# Altium PCB Industrial_IOT_Dev_Brd-v1.0.PcbDoc (part 3 of 8)
Units mil, origin at the board's own origin, x right, y up, seen from the top; angles counter-clockwise.
Board outline 6299.21 x 4724.41 mil, 4 copper layers (Top Layer, Layer 1, Layer 2, Bottom Layer), stack 62.047 mil thick; 376 components, 240 nets, 1129 pads, 635 vias.
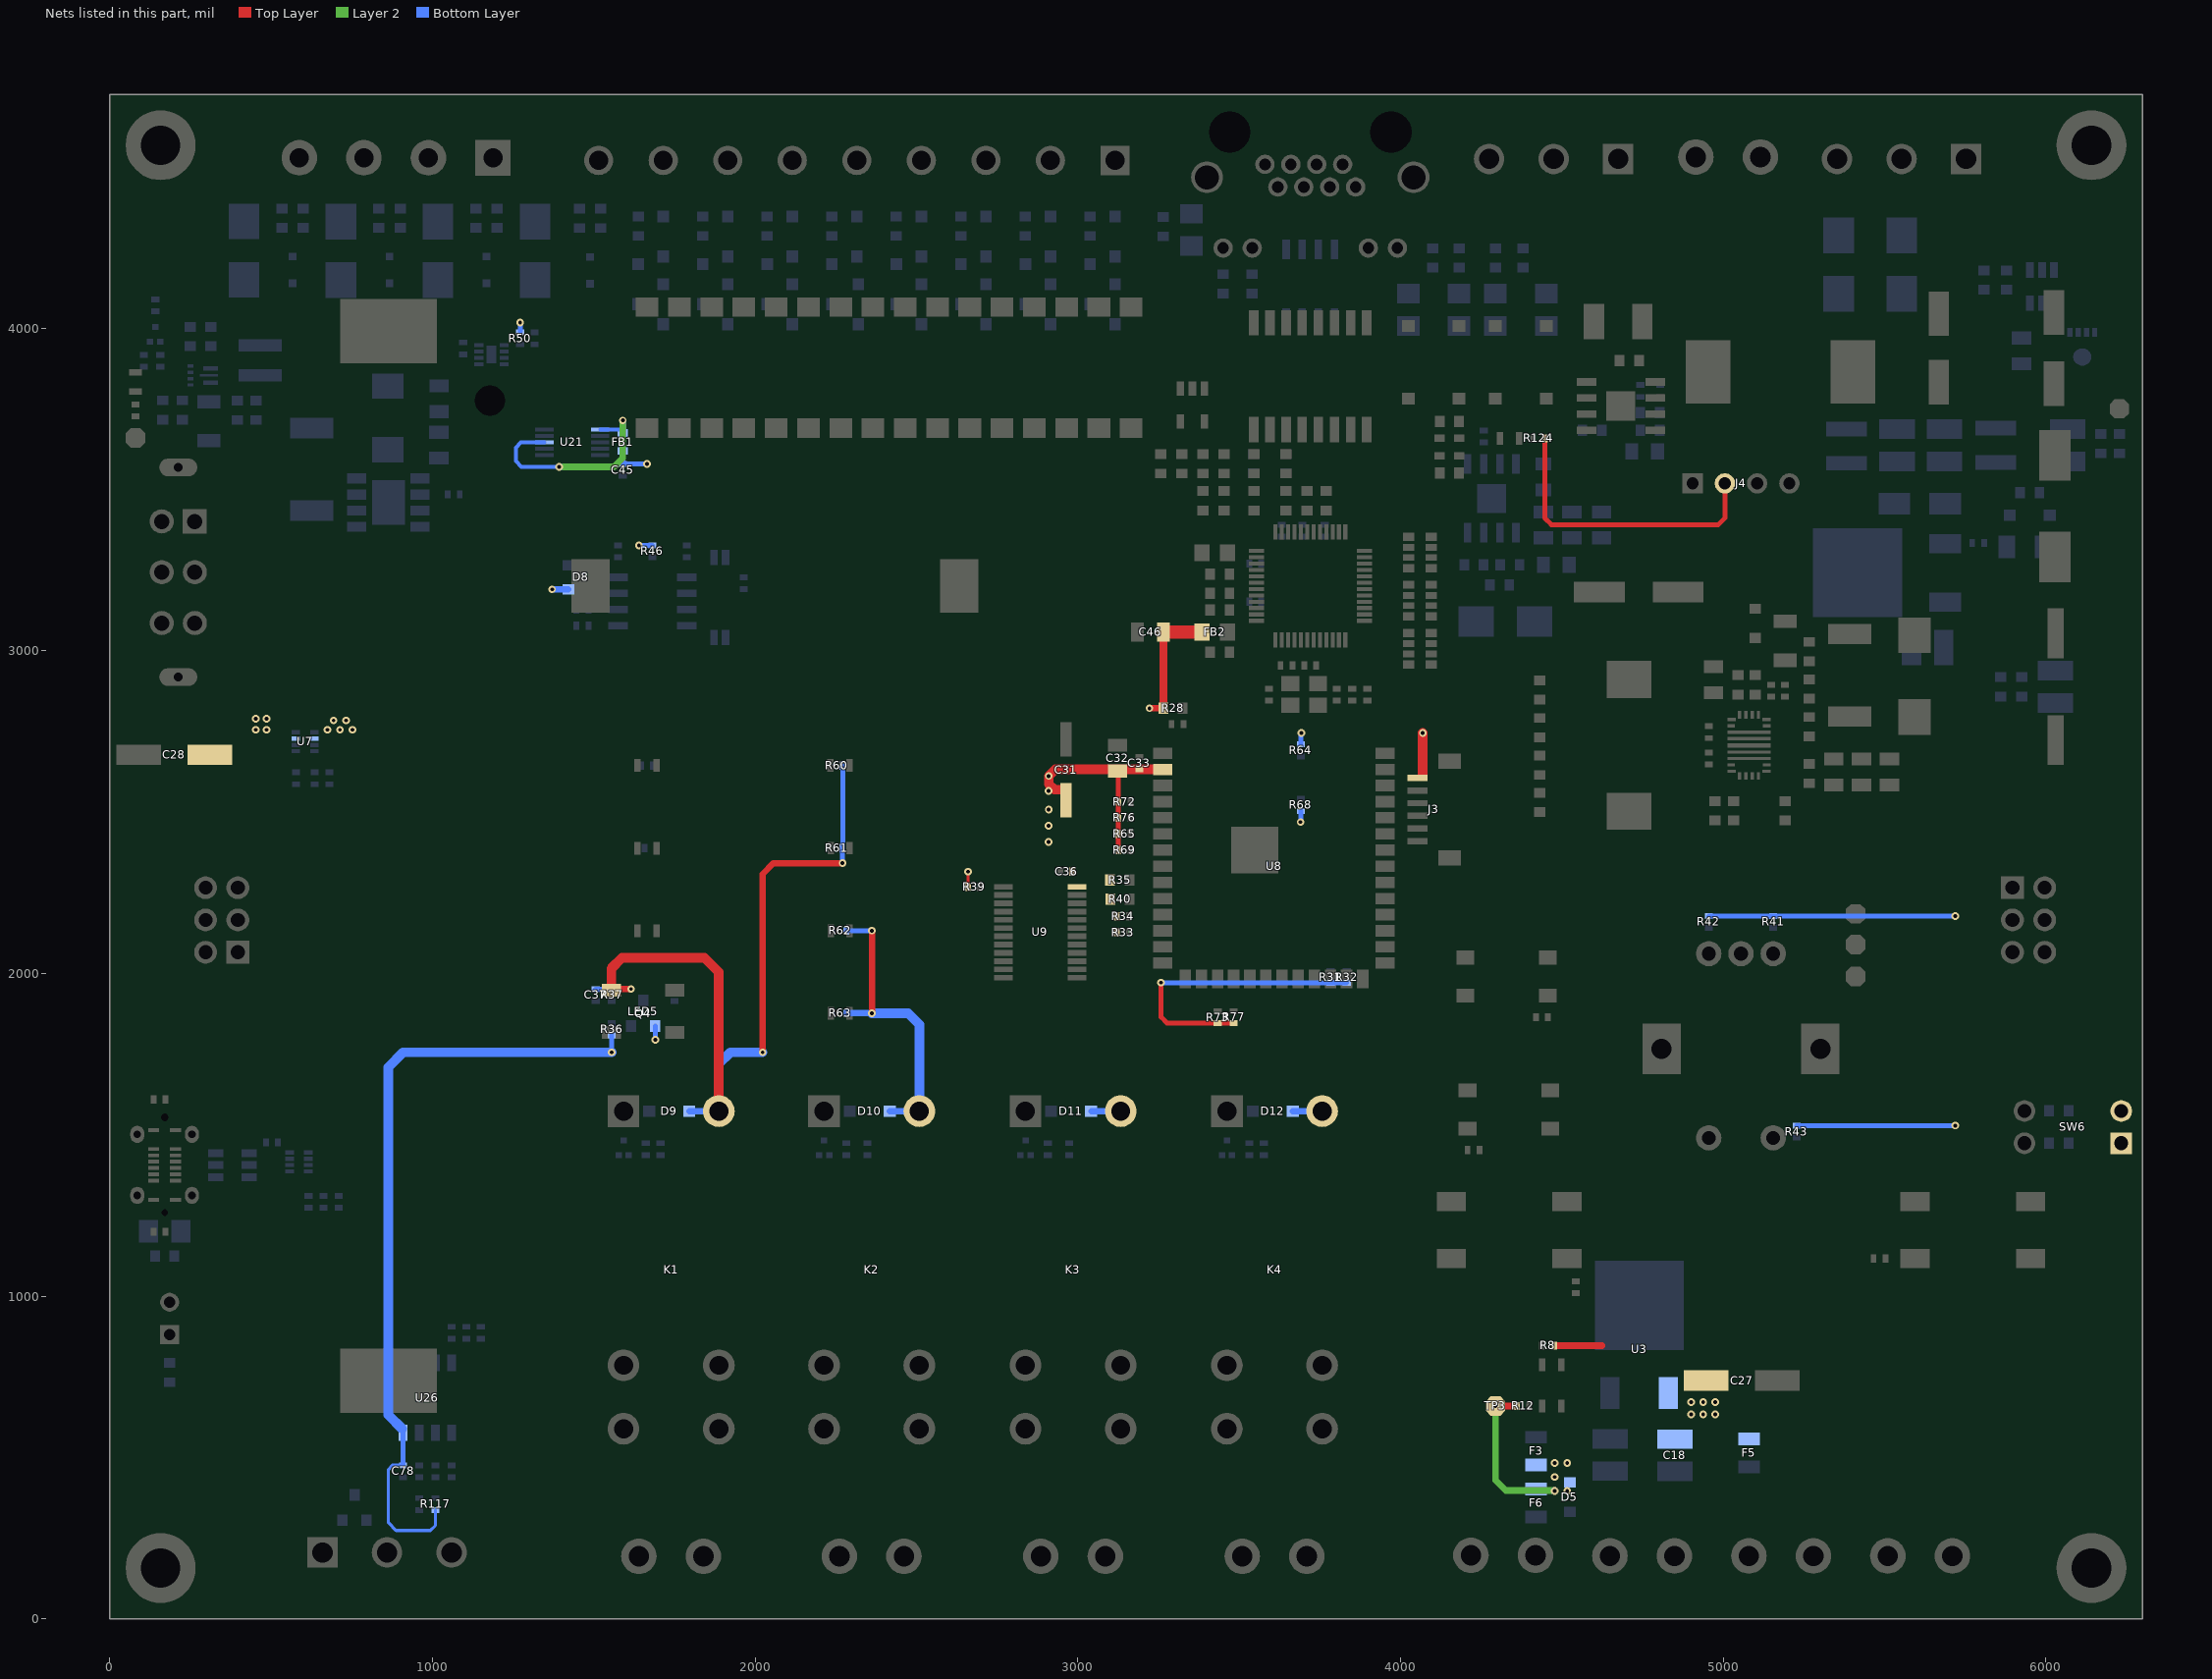
[diagram p4: the nets of this part, all layers, seen from the top]

## Part data (continued)
C80: library part CC0603KRX7R9BB103, "CAP CER 10000PF 50V X7R 0603", Case Code (Imperial)=0603, Case Code (Metric)=1608, Dielectric=X7R, Insulation Resistance=100GR, LCSC Part Number=C100042, Manufacturer=Yageo, Max Operating Temperature=125°C, Min Operating Temperature=-55°C, Package Quantity=1, Supplier Part Number 1=311-1085-6-ND, Tolerance=10%, Voltage=50V, Capacitance=10nF, Case/Package=0603, ComponentLink1Description=http://www.farnell.com/datasheets/1734573.pdf?src-supplier=Element14, ComponentLink1URL=http://www.farnell.com/datasheets/1734573.pdf?src-supplier=Element14, ComponentLink2Description=http://www.yageo.com/documents/recent/UPY-GPHC_X7R_6.3V-to-50V_18.pdf?src-supplier=Digi-Key, ComponentLink2URL=http://www.yageo.com/documents/recent/UPY-GPHC_X7R_6.3V-to-50V_18.pdf?src-supplier=Digi-Key, ComponentLink3Description=http://www.farnell.com/datasheets/2167236.pdf?src-supplier=Mouser, ComponentLink3URL=http://www.farnell.com/datasheets/2167236.pdf?src-supplier=Mouser, ComponentLink4Description=http://www.farnell.com/datasheets/70765.pdf?src-supplier=Element14, ComponentLink4URL=http://www.farnell.com/datasheets/70765.pdf?src-supplier=Element14, ComponentLink5Description=http://www.yageo.com/documents/recent/UPY-GPHC_X7R_6.3V-to-50V_8.pdf?src-supplier=Avnet+Europe, ComponentLink5URL=http://www.yageo.com/documents/recent/UPY-GPHC_X7R_6.3V-to-50V_8.pdf?src-supplier=Avnet+Europe, ComponentLink6Description=http://www.farnell.com/datasheets/1489800.pdf?src-supplier=Element14, ComponentLink6URL=http://www.farnell.com/datasheets/1489800.pdf?src-supplier=Element14, ComponentLink7Description=https://www.verical.com/server-webapp/html/getDatasheet?partID=403582&src-supplier=Verical, ComponentLink7URL=https://www.verical.com/server-webapp/html/getDatasheet?partID=403582&src-supplier=Verical, Composition=Ceramic, Depth=0.8mm, Halogen Free="Halogen Free", Height=0.8mm, Lead Free="Lead Free", Length=1.6mm, Manufacturer Part Number=CC0603KRX7R9BB103, Material=Ceramic, Mount="Surface Mount", Number of Pins=2, Packaging="Tape and Reel", Pricing 1="1=0.1, 10=0.038, 100=0.0171, 500=0.01224, 1000=0.00962 (USD)", Radiation Hardening=No, REACH SVHC="No SVHC", Stock 1=8411467, Supplier 1=Digi-Key, Termination=SMD/SMT, Thickness=0.035inch, Voltage Rating=50V, Voltage Rating (DC)=50V, Width=0.031inch
C81 C82: library part CC0603KRX7R9BB222, "CAP CER 2200PF 50V X7R 0603", Capacitance=2.2nF, Case Code (Imperial)=0603, Case Code (Metric)=1608, Dielectric=X7R, Insulation Resistance=10GR, LCSC Part Number=C107082, Manufacturer=Yageo, Max Operating Temperature=125°C, Min Operating Temperature=-55°C, Package Quantity=1, Resistor Type=Ceramic, Supplier Part Number 1=6169509, Tolerance=10%, Voltage=50V, Case/Package=0603, Category="Ceramic Capacitors", ComponentLink1Description=https://datasheet.ciiva.com/23768/1079489-23768004.pdf?src-supplier=Newark, ComponentLink1URL=https://datasheet.ciiva.com/23768/1079489-23768004.pdf?src-supplier=Newark, ComponentLink2Description=https://datasheet.ciiva.com/11788/0900766b8079c870-11788403.pdf?src-supplier=RSComponents, ComponentLink2URL=https://datasheet.ciiva.com/11788/0900766b8079c870-11788403.pdf?src-supplier=RSComponents, ComponentLink3Description=https://datasheet.ciiva.com/26862/getdatasheetpartid-403587-26862854.pdf?src-supplier=Verical, ComponentLink3URL=https://datasheet.ciiva.com/26862/getdatasheetpartid-403587-26862854.pdf?src-supplier=Verical, ComponentLink4Description=https://datasheet.ciiva.com/8033/70765-8033863.pdf?src-supplier=Element14, ComponentLink4URL=https://datasheet.ciiva.com/8033/70765-8033863.pdf?src-supplier=Element14, ComponentLink5Description=https://datasheet.ciiva.com/7978/1489800-7978172.pdf?src-supplier=Element14, ComponentLink5URL=https://datasheet.ciiva.com/7978/1489800-7978172.pdf?src-supplier=Element14, ComponentLink6Description=https://datasheet.ciiva.com/28450/1489800-28450632.pdf?src-supplier=Element14, ComponentLink6URL=https://datasheet.ciiva.com/28450/1489800-28450632.pdf?src-supplier=Element14, ComponentLink7Description=https://datasheet.ciiva.com/155/mlccorderingcode-155921.pdf?src-supplier=Digi-Key, ComponentLink7URL=https://datasheet.ciiva.com/155/mlccorderingcode-155921.pdf?src-supplier=Digi-Key, ComponentLink8Description=https://datasheet.ciiva.com/155/mlccorderingcode-155920.pdf?src-supplier=Digi-Key, ComponentLink8URL=https://datasheet.ciiva.com/155/mlccorderingcode-155920.pdf?src-supplier=Digi-Key, ComponentLink9Description=https://datasheet.ciiva.com/155/mlccorderingcode-155922.pdf?src-supplier=Digi-Key, ComponentLink9URL=https://datasheet.ciiva.com/155/mlccorderingcode-155922.pdf?src-supplier=Digi-Key, ComponentLink10Description=https://datasheet.ciiva.com/8033/1489800-8033864.pdf?src-supplier=Element14, ComponentLink10URL=https://datasheet.ciiva.com/8033/1489800-8033864.pdf?src-supplier=Element14, ComponentLink11Description=https://datasheet.ciiva.com/8033/1489800-8033862.pdf?src-supplier=Element14, ComponentLink11URL=https://datasheet.ciiva.com/8033/1489800-8033862.pdf?src-supplier=Element14, ComponentLink12Description=https://datasheet.ciiva.com/16625/upy-gphc-x7r-6-3v-to-50v-8-16625531.pdf?src-supplier=Avnet+Europe, ComponentLink12URL=https://datasheet.ciiva.com/16625/upy-gphc-x7r-6-3v-to-50v-8-16625531.pdf?src-supplier=Avnet+Europe, Depth=0.8mm, Dissipation Factor=2.5%, Halogen Free="Halogen Free", Height=0.8mm, Item Type=Capacitor, Lead Free="Lead Free", Length=1.6mm, Manufacturer Part Number=CC0603KRX7R9BB222, Mount="Surface Mount", Number of Pins=2, Packaging="Tape and Reel", Pricing 1="4000=0.00500 (USD)", Radiation Hardening=No, REACH SVHC="No SVHC", RoHS=Yes, RoHS Compliant=Yes, Series=CC, Stock 1=1, Supplier 1=RSComponents, Termination=SMD/SMT, Thickness=0.035inch, Voltage Rating=50V, Voltage Rating (DC)=50V, Width=0.031inch
C86: library part EEE-FK1J220P, "CAP ALUM 22UF 20% 63V SMD", Case/Package=Radial, Dielectric Material=Aluminium, ESR (Equivalent Series Resistance)=1.2R, LCSC Part Number=C401723, Leakage Current=3uA, Manufacturer=Panasonic, Max Operating Temperature=105°C, Min Operating Temperature=-55°C, Package Quantity=1000, Ratings=AEC-Q200, Ripple Current=120mA, Tolerance=20%, Voltage=63V, ComponentLink1Description=https://datasheet.ciiva.com/29313/443500-da-01-en-smd-elko-vfk-e-22-uf-63v-29313681.pdf?src-supplier=Conrad, ComponentLink1URL=https://datasheet.ciiva.com/29313/443500-da-01-en-smd-elko-vfk-e-22-uf-63v-29313681.pdf?src-supplier=Conrad, ComponentLink2Description=https://datasheet.ciiva.com/30079/aba0000ce120-30079519.pdf?src-supplier=Onlinecomponents.com, ComponentLink2URL=https://datasheet.ciiva.com/30079/aba0000ce120-30079519.pdf?src-supplier=Onlinecomponents.com, ComponentLink3Description=https://datasheet.ciiva.com/43463/58258-43463535.pdf?src-supplier=Farnell, ComponentLink3URL=https://datasheet.ciiva.com/43463/58258-43463535.pdf?src-supplier=Farnell, ComponentLink4Description=https://datasheet.ciiva.com/46388/58258-46388604.pdf?src-supplier=Element14, ComponentLink4URL=https://datasheet.ciiva.com/46388/58258-46388604.pdf?src-supplier=Element14, Construction=Cylindrical, Diameter=8mm, Dissipation Factor=8%, Height=6.2mm, Impedance=1.2R, Item Type=Capacitor, Lead Free="Lead Free", Length=6.2mm, Life (Hours)=2000Hour, Manufacturer Part Number=EEE-FK1J220P, Material=Aluminium, Mounting Technology="Surface Mount,PCB", Packaging="Tape and Reel", Pricing="1=0.67, 10=0.451, 50=0.355, 100=0.319, 1000=0.22, 10000=0.197 (USD)", Radiation Hardening=No, Reach SVHC Compliant=No, Ripple Current (AC)=120mA, RoHS=Yes, RoHS Compliant=Yes, Series=FK, Size=6.2mm, Stock=7838, Supplier=Mouser, Termination=SMD/SMT, Voltage Rating=63V, Voltage Rating (AC)=63V, Voltage Rating (DC)=63V, Width=8.3mm
D1: "TVS DIODE 58VWM 93.6VC SMB", LCSC Part Number=C135085, Manufacturer=Diodes, ComponentLink1Description=https://datasheet.ciiva.com/25624/0900766b8104bed2-25624843.pdf?src-supplier=Rs, ComponentLink1URL=https://datasheet.ciiva.com/25624/0900766b8104bed2-25624843.pdf?src-supplier=Rs, ComponentLink2Description=https://datasheet.ciiva.com/15143/getdatasheetpartid-39642-15143045.pdf?src-supplier=Verical, ComponentLink2URL=https://datasheet.ciiva.com/15143/getdatasheetpartid-39642-15143045.pdf?src-supplier=Verical, ComponentLink3Description=https://datasheet.ciiva.com/4520/ds19002-4520617.pdf?src-supplier=Mouser, ComponentLink3URL=https://datasheet.ciiva.com/4520/ds19002-4520617.pdf?src-supplier=Mouser, ComponentLink4Description=https://datasheet.ciiva.com/16393/ds19002-16393005.pdf?src-supplier=Future+Electronics, ComponentLink4URL=https://datasheet.ciiva.com/16393/ds19002-16393005.pdf?src-supplier=Future+Electronics, Item Type=Diode, Manufacturer Part Number=SMBJ58A-13-F, Pricing="3000=0.0711, 9000=0.0684, 15000=0.0671, 30000=0.0655, 60000=0.063 (USD)", RoHS=Yes, Stock=6000, Supplier="Future Electronics"
D2 D15 D17 D21 D23 D27 D29 D33 D35: "26.7V 24V SOD-123 ESD and Surge Protection (TVS/ESD) ROHS", LCSC Part Number=C5571859, Manufacturer=AMAZING, Package=SOD-123, ComponentLink1Description=LCSC, ComponentLink1URL=https://www.lcsc.com/product-detail/ESD-and-Surge-Protection-TVS-ESD_AMAZING-AZ4024-01G_C5571859.html, Item Type=(TVS/ESD), Manufacturer Part Number=AZ4024-01G
D3: "18A 250W 8V 5.5V Bidirectional 5V SOD-323 ESD and Surge Protection (TVS/ESD) ROHS", LCSC Part Number=C41409246, Manufacturer=ElecSuper, Package=SOD-323, ComponentLink1Description=LCSC, ComponentLink1URL=https://www.lcsc.com/product-detail/ESD-and-Surge-Protection-TVS-ESD_ElecSuper-PESD5V0S1BA-115-ES_C41409246.html, Item Type=ESD/TVS, Manufacturer Part Number=PESD5V0S1BA,115-ES
D4: "TVS DIODE 26VWM 42.1VC SMB", LCSC Part Number=C135062, Manufacturer=Diodes, Supplier Part Number=3363900, ComponentLink1Description=https://datasheet.ciiva.com/15143/getdatasheetpartid-118169-15143570.pdf?src-supplier=Verical, ComponentLink1URL=https://datasheet.ciiva.com/15143/getdatasheetpartid-118169-15143570.pdf?src-supplier=Verical, ComponentLink2Description=https://datasheet.ciiva.com/16211/ds19002-16211003.pdf?src-supplier=Future+Electronics, ComponentLink2URL=https://datasheet.ciiva.com/16211/ds19002-16211003.pdf?src-supplier=Future+Electronics, Item Type="TVS Diodes", Manufacturer Part Number=SMBJ26A-13-F, Pricing="3000=0.0717, 9000=0.069, 15000=0.0677, 30000=0.0661, 60000=0.0635 (USD)", RoHS=Yes, Stock=9000, Supplier="Future Electronics"
D5: "30A 360W 7V 3.5V Bidirectional 3.3V SOD-323 ESD and Surge Protection (TVS/ESD) ROHS", LCSC Part Number=C41409249, Manufacturer=ElecSuper, Package=SOD-323, ComponentLink1Description=LCSC, ComponentLink1URL=https://www.lcsc.com/product-detail/ESD-and-Surge-Protection-TVS-ESD_ElecSuper-PESD3V3L1BA-N-ES_C41409249.html, Item Type=ESD/TVS, Manufacturer Part Number=PESD3V3L1BA-N-ES
D6: "SOD-123FL Schottky Barrier Diodes (SBD) ROHS", LCSC Part Number=C5366303, Manufacturer=Shikues, Package=SOD-123FL, ComponentLink1Description=LCSC, ComponentLink1URL=https://www.lcsc.com/product-detail/Schottky-Barrier-Diodes-SBD_Shikues-PMEG4030ER_C5366303.html, Item Type=Diode, Manufacturer Part Number=PMEG4030ER
D7: "DIODE ZENER 16V 1.5W SMA", LCSC Part Number=C128848, Manufacturer=onsemi, Package=SMA, ComponentLink1Description=LCSC, ComponentLink1URL=https://www.lcsc.com/product-detail/Zener-Diodes_onsemi-1SMA5930BT3G_C128848.html, Item Type="Zener diode", Manufacturer Part Number=1SMA5930BT3G
D8: "30V Dual Common Cathode 1V@100mA 200mA SOT-23(TO-236) Schottky Barrier Diodes (SBD) ROHS", LCSC Part Number=C2762215, Manufacturer="Shandong Jingdao Microelectronics", Package=SOT-23(TO-236), ComponentLink1Description=LCSC, ComponentLink1URL=https://www.lcsc.com/product-detail/Schottky-Barrier-Diodes-SBD_Shandong-Jingdao-Microelectronics-BAT54C_C2762215.html, Item Type=Diode, Manufacturer Part Number=BAT54C
D9 D10 D11 D12 D13 D14 D19 D20 D25 D26 D31 D32: "DIODE GEN PURP 100V 300MA SOD123", Average Rectified Current=300mA, Current Rating=150mA, Forward Voltage=1.25V, LCSC Part Number=C83528, Manufacturer=Diodes, Max Forward Surge Current (Ifsm)=2A, Max Operating Temperature=150°C, Max Repetitive Reverse Voltage (Vrrm)=100V, Max Reverse Current=1uA, Min Operating Temperature=-65°C, Package Quantity=3000, Power Dissipation=400mW, Supplier Part Number 1=7634694, Voltage Rating (DC)=75V, Category="Rectifier Diodes", ComponentLink1Description=https://datasheet.ciiva.com/1179/1915529-1179304.pdf?src-supplier=Element14, ComponentLink1URL=https://datasheet.ciiva.com/1179/1915529-1179304.pdf?src-supplier=Element14, ComponentLink2Description=https://datasheet.ciiva.com/22695/1915529-22695239.pdf?src-supplier=Element14, ComponentLink2URL=https://datasheet.ciiva.com/22695/1915529-22695239.pdf?src-supplier=Element14, ComponentLink3Description=https://datasheet.ciiva.com/8300/ds30086-8300392.pdf?src-supplier=Avnet, ComponentLink3URL=https://datasheet.ciiva.com/8300/ds30086-8300392.pdf?src-supplier=Avnet, ComponentLink4Description=https://datasheet.ciiva.com/15219/getdatasheetpartid-110030-15219548.pdf?src-supplier=Verical, ComponentLink4URL=https://datasheet.ciiva.com/15219/getdatasheetpartid-110030-15219548.pdf?src-supplier=Verical, ComponentLink5Description=https://datasheet.ciiva.com/8303/ds30086-8303197.pdf?src-supplier=Avnet, ComponentLink5URL=https://datasheet.ciiva.com/8303/ds30086-8303197.pdf?src-supplier=Avnet, ComponentLink6Description=https://datasheet.ciiva.com/911/ds30086-911735.pdf?src-supplier=Digi-Key, ComponentLink6URL=https://datasheet.ciiva.com/911/ds30086-911735.pdf?src-supplier=Digi-Key, ComponentLink7Description=https://datasheet.ciiva.com/911/ds30086-911736.pdf?src-supplier=Digi-Key, ComponentLink7URL=https://datasheet.ciiva.com/911/ds30086-911736.pdf?src-supplier=Digi-Key, ComponentLink8Description=https://datasheet.ciiva.com/911/ds30086-911734.pdf?src-supplier=Digi-Key, ComponentLink8URL=https://datasheet.ciiva.com/911/ds30086-911734.pdf?src-supplier=Digi-Key, ComponentLink9Description=https://datasheet.ciiva.com/4435/ds30086-4435128.pdf?src-supplier=Mouser, ComponentLink9URL=https://datasheet.ciiva.com/4435/ds30086-4435128.pdf?src-supplier=Mouser, Contact Plating=Tin,Matte, Element Configuration=Single, Forward Current=150mA, Height=1.25mm, Item Type=Diode, Lead Free="Lead Free", Length=2.85mm, Manufacturer Part Number=1N4148W-7-F, Max Reverse Voltage (DC)=100V, Max Surge Current=2A, Mounting Technology="Surface Mount", Output Current=150mA, Packaging="Tape and Reel", Peak Non-Repetitive Surge Current=2A, Pins=2, Polarity=Standard, Power Rating=400mW, Pricing 1="3000=0.01840, 12000=0.01760, 45000=0.01690, 120000=0.01640, 300000=0.01560 (USD)", Radiation Hardening=No, Reach SVHC Compliant=Yes, Recovery Time=4ns, Reverse Recovery Time=4ns, Reverse Recovery Time-Max=4ns, RoHS=Yes, RoHS Compliant=Yes, Series=-, Stock 1=32931000, Supplier 1="Future Electronics", Voltage=100V, Weight=0.000353oz, Width=1.7mm
D16 D18 D22 D24 D28 D30 D34 D36: "Independent Type 22.8V~25.6V 500mW 24V SOD-123 Zener Diodes ROHS", LCSC Part Number=C266572, Manufacturer=BORN, Package=SOD-123, Item Type="Zener Diode", Manufacturer Part Number=BZT52C24
D37 D38 D41 D42: "TVS DIODE 12VWM 19.9VC DO214AA", LCSC Part Number=C151251, Manufacturer=Littelfuse, ComponentLink1Description=https://datasheet.ciiva.com/15143/getdatasheetpartid-185160-15143884.pdf?src-supplier=Verical, ComponentLink1URL=https://datasheet.ciiva.com/15143/getdatasheetpartid-185160-15143884.pdf?src-supplier=Verical, ComponentLink2Description=https://datasheet.ciiva.com/34302/1546611-34302457.pdf?src-supplier=Jameco, ComponentLink2URL=https://datasheet.ciiva.com/34302/1546611-34302457.pdf?src-supplier=Jameco, ComponentLink3Description=https://datasheet.ciiva.com/25624/0900766b810f4eeb-25624681.pdf?src-supplier=Rs, ComponentLink3URL=https://datasheet.ciiva.com/25624/0900766b810f4eeb-25624681.pdf?src-supplier=Rs, ComponentLink4Description=https://datasheet.ciiva.com/16287/littelfuse-tvs-diode-smbj-16287565.pdf?src-supplier=Future+Electronics, ComponentLink4URL=https://datasheet.ciiva.com/16287/littelfuse-tvs-diode-smbj-16287565.pdf?src-supplier=Future+Electronics, ComponentLink5Description=https://datasheet.ciiva.com/331/littelfuse-tvs-diode-smbj-datasheet-pdf-331137.pdf?src-supplier=Digikey, ComponentLink5URL=https://datasheet.ciiva.com/331/littelfuse-tvs-diode-smbj-datasheet-pdf-331137.pdf?src-supplier=Digikey, ComponentLink6Description=https://datasheet.ciiva.com/331/littelfuse-tvs-diode-smbj-datasheet-pdf-331138.pdf?src-supplier=Digikey, ComponentLink6URL=https://datasheet.ciiva.com/331/littelfuse-tvs-diode-smbj-datasheet-pdf-331138.pdf?src-supplier=Digikey, ComponentLink7Description=https://datasheet.ciiva.com/331/littelfuse-tvs-diode-smbj-datasheet-pdf-331139.pdf?src-supplier=Digikey, ComponentLink7URL=https://datasheet.ciiva.com/331/littelfuse-tvs-diode-smbj-datasheet-pdf-331139.pdf?src-supplier=Digikey, ComponentLink8Description=https://datasheet.ciiva.com/8062/littelfuse-tvs-diode-smbj-8062301.pdf?src-supplier=Element14, ComponentLink8URL=https://datasheet.ciiva.com/8062/littelfuse-tvs-diode-smbj-8062301.pdf?src-supplier=Element14, Item Type="TVS Diodes", Manufacturer Part Number=SMBJ12A, Pricing="1=0.32, 10=0.215, 100=0.104 (USD)", RoHS=Yes, Stock=39718, Supplier=Digikey
D39 D40 D43 D44: "DIODE ZENER 3.3V 200MW SOD323F", Forward Voltage=1V, LCSC Part Number=C2978865, Manufacturer="ON Semiconductor / Fairchild", Max Operating Temperature=150°C, Max Power Dissipation=200mW, Max Reverse Leakage Current=4.5uA, Min Operating Temperature=-65°C, Package Quantity=1, Supplier Part Number 1=MM3Z3V3BCT-ND, Test Current=5mA, Tolerance=2%, Working Voltage=3.3V, ComponentLink1Description=http://www.onsemi.com/pub/Collateral/MM3Z9V1B-D.pdf?src-supplier=Digi-Key, ComponentLink1URL=http://www.onsemi.com/pub/Collateral/MM3Z9V1B-D.pdf?src-supplier=Digi-Key, ComponentLink2Description=http://www.mouser.com/ds/2/149/MM3Z3V3B-187166.pdf?src-supplier=Mouser, ComponentLink2URL=http://www.mouser.com/ds/2/149/MM3Z3V3B-187166.pdf?src-supplier=Mouser, ComponentLink3Description=https://www.fairchildsemi.com/datasheets/MM/MM3Z9V1B.pdf?src-supplier=Avnet, ComponentLink3URL=https://www.fairchildsemi.com/datasheets/MM/MM3Z9V1B.pdf?src-supplier=Avnet, ComponentLink4Description=http://www.farnell.com/datasheets/1706525.pdf?src-supplier=Element14, ComponentLink4URL=http://www.farnell.com/datasheets/1706525.pdf?src-supplier=Element14, Element Configuration=Single, Height=1mm, Impedance=89R, Item Type=Diode, Lead Free="Lead Free", Length=1.3mm, Manufacturer Part Number=MM3Z3V3B, Mount="Surface Mount", Number of Pins=2, Packaging="Tape and Reel", Peak Reverse Current=4.5uA, Power Dissipation=200mW, Pricing 1="1=0.22, 10=0.18, 100=0.0956, 500=0.06288, 1000=0.04276 (USD)", Radiation Hardening=No, REACH SVHC="No SVHC", Stock 1=473644, Supplier 1=Digi-Key, Voltage Tolerance=2%, Weight=0.0276g, Width=1.7mm, Zener Voltage=3.3V
D45: "TVS DIODE 2.8VWM 15VC 8-SOIC", LCSC Part Number=C2763559, Manufacturer=Littelfuse, ComponentLink1Description=https://datasheet.ciiva.com/6578/littelfusetvsdiodearrayslvu284-6578256.pdf?src-supplier=Digikey, ComponentLink1URL=https://datasheet.ciiva.com/6578/littelfusetvsdiodearrayslvu284-6578256.pdf?src-supplier=Digikey, ComponentLink2Description=https://datasheet.ciiva.com/15186/getdatasheetpartid-492857-15186609.pdf?src-supplier=Verical, ComponentLink2URL=https://datasheet.ciiva.com/15186/getdatasheetpartid-492857-15186609.pdf?src-supplier=Verical, ComponentLink3Description=https://datasheet.ciiva.com/4507/littelfuse-tvs-diode-array-slvu2-8-4-64488-4507717.pdf?src-supplier=Mouser, ComponentLink3URL=https://datasheet.ciiva.com/4507/littelfuse-tvs-diode-array-slvu2-8-4-64488-4507717.pdf?src-supplier=Mouser, ComponentLink4Description=https://datasheet.ciiva.com/6578/littelfuse-tvs-diode-array-slvu2-8-4-datasheet-pdf-6578252.pdf?src-supplier=Digikey, ComponentLink4URL=https://datasheet.ciiva.com/6578/littelfuse-tvs-diode-array-slvu2-8-4-datasheet-pdf-6578252.pdf?src-supplier=Digikey, ComponentLink5Description=https://datasheet.ciiva.com/6578/littelfuse-tvs-diode-array-slvu2-8-4-datasheet-pdf-6578255.pdf?src-supplier=Digikey, ComponentLink5URL=https://datasheet.ciiva.com/6578/littelfuse-tvs-diode-array-slvu2-8-4-datasheet-pdf-6578255.pdf?src-supplier=Digikey, Item Type="TVS Diodes", Manufacturer Part Number=SLVU2.8-4BTG, Pricing="1=1.79, 10=1.5, 50=1.5, 100=1.11, 1000=0.899, 10000=0.832 (USD)", RoHS=Yes, Stock=4572, Supplier=Mouser
D46 D47: "50A 2A 1kV ABS Bridge Rectifiers ROHS", LCSC Part Number=C113925, Manufacturer="MDD(Microdiode Semiconductor)", Package=ABS, Item Type="Bridge Rectifier", Manufacturer Part Number=ABS210
D48: "100V 850mV@3A 3A SMA(DO-214AC) Schottky Diodes ROHS", LCSC Part Number=C91474, Manufacturer="MCC(Micro Commercial Components)", Package=SMA(DO-214AC), ComponentLink1Description=LCSC, ComponentLink1URL=https://www.lcsc.com/product-detail/Schottky-Diodes_MCC-Micro-Commercial-Components-SK310A-LTP_C91474.html?s_z=n_SK310A, Item Type=Diode, Manufacturer Part Number=SK310A-LTP
D49: "6.5A 600W 93.6V 71.2V 58V SMB(DO-214AA) ESD and Surge Protection (TVS/ESD) ROHS", LCSC Part Number=C123824, Manufacturer="MDD(Microdiode Semiconductor)", Package=SMB(DO-214AA), ComponentLink1Description=LCSC, ComponentLink1URL=https://www.lcsc.com/product-detail/ESD-and-Surge-Protection-TVS-ESD_MDD-Microdiode-Semiconductor-SMBJ58A_C123824.html?s_z=n_SMBJ58A, Item Type=Diode, Manufacturer Part Number=SMBJ58A
D50: "SOT-23 TVS ROHS", LCSC Part Number=C521963, Manufacturer="TECH PUBLIC", Package=SOT-23, ComponentLink1Description=LCSC, ComponentLink1URL=https://www.lcsc.com/product-detail/TVS_TECH-PUBLIC-SM712_C521963.html, Item Type=Diode, Manufacturer Part Number=SM712
F1 F7: "24V 750mA 100A 1.5A 1210 Resettable Fuses ROHS", Current Rating=100A, LCSC Part Number=C207045, Manufacturer=Littlefuse, Supplier Part Number=F4146CT-ND, Voltage Rating=24V, Category="PTC Resettable Fuses", ComponentLink1Description=https://datasheet.ciiva.com/8005/littelfuse-ptc-1210l-8005372.pdf?src-supplier=Element14, ComponentLink1URL=https://datasheet.ciiva.com/8005/littelfuse-ptc-1210l-8005372.pdf?src-supplier=Element14, ComponentLink2Description=https://datasheet.ciiva.com/326/littelfuse-ptc-1210l-326060.pdf?src-supplier=Digikey, ComponentLink2URL=https://datasheet.ciiva.com/326/littelfuse-ptc-1210l-326060.pdf?src-supplier=Digikey, ComponentLink3Description=https://datasheet.ciiva.com/326/littelfuse-ptc-1210l-326061.pdf?src-supplier=Digikey, ComponentLink3URL=https://datasheet.ciiva.com/326/littelfuse-ptc-1210l-326061.pdf?src-supplier=Digikey, ComponentLink4Description=https://datasheet.ciiva.com/326/littelfuse-ptc-1210l-326062.pdf?src-supplier=Digikey, ComponentLink4URL=https://datasheet.ciiva.com/326/littelfuse-ptc-1210l-326062.pdf?src-supplier=Digikey, Height=1.8mm, Item Type=Fuse, Lead Free=5697LeadFree, Manufacturer Part Number=1210L075/24PR, Pricing="1=0.98, 5=0.81, 10=0.747, 50=0.6196, 100=0.5716, 250=0.51376, 500=0.47378, 1000=0.43676 (USD)", RoHS=Yes, Stock=2300, Supplier=Digikey
F2 F4: "6V 3A 100A 6A 1206 Resettable Fuses ROHS", LCSC Part Number=C883136, Manufacturer=BHFUSE, Package=1206, ComponentLink1Description=LCSC, ComponentLink1URL=https://www.lcsc.com/product-detail/Resettable-Fuses_BHFUSE-BSMD1206-300-6V_C883136.html?s_z=n_BSMD1206-300-6V, Item Type=Fuses, Manufacturer Part Number=BSMD1206-300-6V
F3 F5: "PTC Resettable Fuse 6V 100A 2-Pin 0805 T/R", LCSC Part Number=C269107, Manufacturer=Yageo, Item Type="PTC Resettable Fuses", Manufacturer Part Number=SMD0805B110TF, Pricing="1=0.15, 5=0.126, 10=0.116, 50=0.0962, 100=0.0887, 250=0.07976, 500=0.07358, 1000=0.06788 (USD)", RoHS=Yes, Stock=3000, Supplier=Digikey
F6: "6V 500mA 100A 1A 0805 Resettable Fuses ROHS", Manufacturer=Littelfuse, Supplier Part Number=F2772CT-ND, Voltage Rating=6V, Category="PTC Resettable Fuses", ComponentLink1Description=https://datasheet.ciiva.com/326/littelfuse-ptc-0805l-326196.pdf?src-supplier=Digikey, ComponentLink1URL=https://datasheet.ciiva.com/326/littelfuse-ptc-0805l-326196.pdf?src-supplier=Digikey, ComponentLink2Description=https://datasheet.ciiva.com/4501/littelfuse-0805l-32472-4501285.pdf?src-supplier=Mouser, ComponentLink2URL=https://datasheet.ciiva.com/4501/littelfuse-0805l-32472-4501285.pdf?src-supplier=Mouser, ComponentLink3Description=https://datasheet.ciiva.com/28410/147852-28410764.pdf?src-supplier=Element14, ComponentLink3URL=https://datasheet.ciiva.com/28410/147852-28410764.pdf?src-supplier=Element14, ComponentLink4Description=https://datasheet.ciiva.com/8005/littelfuse-0805-8005343.pdf?src-supplier=Element14, ComponentLink4URL=https://datasheet.ciiva.com/8005/littelfuse-0805-8005343.pdf?src-supplier=Element14, ComponentLink5Description=https://datasheet.ciiva.com/1273/611626-1273580.pdf?src-supplier=Element14, ComponentLink5URL=https://datasheet.ciiva.com/1273/611626-1273580.pdf?src-supplier=Element14, ComponentLink6Description=https://datasheet.ciiva.com/15186/getdatasheetpartid-27833-15186860.pdf?src-supplier=Verical, ComponentLink6URL=https://datasheet.ciiva.com/15186/getdatasheetpartid-27833-15186860.pdf?src-supplier=Verical, ComponentLink7Description=https://datasheet.ciiva.com/16389/littelfuse-0805-16389019.pdf?src-supplier=Future+Electronics, ComponentLink7URL=https://datasheet.ciiva.com/16389/littelfuse-0805-16389019.pdf?src-supplier=Future+Electronics, ComponentLink8Description=https://datasheet.ciiva.com/326/littelfuse-ptc-0805l-326197.pdf?src-supplier=Digikey, ComponentLink8URL=https://datasheet.ciiva.com/326/littelfuse-ptc-0805l-326197.pdf?src-supplier=Digikey, ComponentLink9Description=https://datasheet.ciiva.com/326/littelfuse-ptc-0805l-326198.pdf?src-supplier=Digikey, ComponentLink9URL=https://datasheet.ciiva.com/326/littelfuse-ptc-0805l-326198.pdf?src-supplier=Digikey, Height=1.25mm, Item Type=Fuse, LCSC Part Number=0805L050WR, Lead Free=5697LeadFree, Manufacturer Part Number=0805L050WR, Pricing="1=0.5, 5=0.41, 10=0.378, 50=0.314, 100=0.2897, 250=0.2604, 500=0.2402, 1000=0.2215 (USD)", RoHS=Yes, Stock=52328, Supplier=DigiKey, Width=1.2mm
FB1: library part BLM18PG121SN1D, "Ferrite Beads Multi-Layer 120Ohm 25% 100MHz 2A 50mOhm DCR 0603 Paper T/R", Case Code (Imperial)=0603, Case Code (Metric)=1608, Current Rating=2A, DC Resistance (DCR)=50mR, Frequency=100MHz, LCSC Part Number=C14709, Manufacturer="Murata Electronics", Max Operating Temperature=125°C, Min Operating Temperature=-55°C, Package Quantity=1, Supplier Part Number=490-1037-1-ND, Tolerance=25%, Case/Package=0603, Category="Ferrite Beads and Chips", ComponentLink1Description=LCSC, ComponentLink1URL=https://www.lcsc.com/product-detail/Ferrite-Beads_Murata-Electronics-BLM18PG121SN1D_C14709.html, ComponentLink2Description=https://datasheet.ciiva.com/5709/1740433-5709171.pdf?src-supplier=Farnell, ComponentLink2URL=https://datasheet.ciiva.com/5709/1740433-5709171.pdf?src-supplier=Farnell, ComponentLink3Description=https://datasheet.ciiva.com/19454/1845013-19454715.pdf?src-supplier=Jameco, ComponentLink3URL=https://datasheet.ciiva.com/19454/1845013-19454715.pdf?src-supplier=Jameco, ComponentLink4Description=https://datasheet.ciiva.com/11799/0900766b81275ca5-11799546.pdf?src-supplier=Rs, ComponentLink4URL=https://datasheet.ciiva.com/11799/0900766b81275ca5-11799546.pdf?src-supplier=Rs, ComponentLink5Description=https://datasheet.ciiva.com/3854/5emiapbde-1-3854039.pdf?src-supplier=Arrow+Electronics, ComponentLink5URL=https://datasheet.ciiva.com/3854/5emiapbde-1-3854039.pdf?src-supplier=Arrow+Electronics, ComponentLink6Description=https://datasheet.ciiva.com/29347/442365-da-01-en-chip-drossel-0603-120r-2000ma-1-6x0-8mm-29347911.pdf?src-supplier=Conrad, ComponentLink6URL=https://datasheet.ciiva.com/29347/442365-da-01-en-chip-drossel-0603-120r-2000ma-1-6x0-8mm-29347911.pdf?src-supplier=Conrad, ComponentLink7Description=https://datasheet.ciiva.com/8021/1740433-8021493.pdf?src-supplier=Element14, ComponentLink7URL=https://datasheet.ciiva.com/8021/1740433-8021493.pdf?src-supplier=Element14, ComponentLink8Description=https://datasheet.ciiva.com/8021/1740433-8021494.pdf?src-supplier=Element14, ComponentLink8URL=https://datasheet.ciiva.com/8021/1740433-8021494.pdf?src-supplier=Element14, ComponentLink9Description=https://datasheet.ciiva.com/14122/blm-series-eng-tds-14122905.pdf?src-supplier=Distrelec, ComponentLink9URL=https://datasheet.ciiva.com/14122/blm-series-eng-tds-14122905.pdf?src-supplier=Distrelec, ComponentLink10Description=https://datasheet.ciiva.com/6212/l0110s0100blm18p-6212502.pdf?src-supplier=Digikey, ComponentLink10URL=https://datasheet.ciiva.com/6212/l0110s0100blm18p-6212502.pdf?src-supplier=Digikey, ComponentLink11Description=https://datasheet.ciiva.com/6212/l0110s0100blm18p-6212504.pdf?src-supplier=Digikey, ComponentLink11URL=https://datasheet.ciiva.com/6212/l0110s0100blm18p-6212504.pdf?src-supplier=Digikey, ComponentLink12Description=https://datasheet.ciiva.com/3081/l0110s0100blm18p-3081632.pdf?src-supplier=Avnet, ComponentLink12URL=https://datasheet.ciiva.com/3081/l0110s0100blm18p-3081632.pdf?src-supplier=Avnet, ComponentLink13Description=https://datasheet.ciiva.com/41449/001172297-da-01-en-drossel-0603-120r-1-6x0-8mm-4000st-41449659.pdf?src-supplier=Conrad, ComponentLink13URL=https://datasheet.ciiva.com/41449/001172297-da-01-en-drossel-0603-120r-1-6x0-8mm-4000st-41449659.pdf?src-supplier=Conrad, Core Material=Ferrite, DC Current=2A, DC Resistance-Max=50mR, Depth=0.8mm, ESR=50mR, Height=0.8mm, Impedance=120R, Item Type="Ferrite Bead", Lead Free="Lead Free", Length=1.6mm, Manufacturer Part Number=BLM18PG121SN1D, Material=Steel,Ferrite, Max Current Rating=2A, Max DC Current=2A, Number of Circuits=1, Number of Lines=1, Package=0603, Packaging="Tape and Reel", Pins=2, Pricing="1=0.1, 10=0.078, 25=0.0712, 50=0.064, 100=0.0469, 250=0.03412, 500=0.03128, 1000=0.02701 (USD)", Radiation Hardening=No, Reach SVHC Compliant=No, RMS Current (Irms)=2A, RoHS=Yes, RoHS Compliant=Yes, Series=BLM18P, Shielding=Unshielded, Stock=1240, Supplier=Digikey, Termination=SMD/SMT, Test Frequency=100MHz, Width=0.8mm
FB2 FB3: "100mΩ ±25% 600Ω@100MHz 0805 Ferrite Beads ROHS", LCSC Part Number=C139168, Manufacturer=FH, Package=0805, ComponentLink1Description=LCSC, ComponentLink1URL=https://www.lcsc.com/product-detail/Ferrite-Beads_FH-Guangdong-Fenghua-Advanced-Tech-CBM201209U601T_C139168.html, Item Type="Ferrite Bead", Manufacturer Part Number=CBM201209U601T
FB4 FB5: "FERRITE BEAD 220 OHM 0603 1LN", LCSC Part Number=C307771, Manufacturer=TDK, Package=0603, RMS Current (Irms)=2.2A, Supplier Part Number=810-MPZ1608S221ATD25, Category="Ferrite Beads and Chips", ComponentLink1Description=http://www.mouser.com/ds/2/400/eads_commercial_power_mpz1608_en-923650.pdf?src-supplier=Mouser, ComponentLink1URL=http://www.mouser.com/ds/2/400/eads_commercial_power_mpz1608_en-923650.pdf?src-supplier=Mouser, ComponentLink2Description=https://media.digikey.com/pdf/Data%20Sheets/TDK%20PDFs/MPZ_Series_Br.pdf?src-supplier=Digikey, ComponentLink2URL=https://media.digikey.com/pdf/Data%20Sheets/TDK%20PDFs/MPZ_Series_Br.pdf?src-supplier=Digikey, ComponentLink3Description=https://product.tdk.com/info/en/catalog/datasheets/beads_automotive_power_mpz1608_en.pdf?ref_disty=digikey&src-supplier=Digikey, ComponentLink3URL=https://product.tdk.com/info/en/catalog/datasheets/beads_automotive_power_mpz1608_en.pdf?ref_disty=digikey&src-supplier=Digikey, ComponentLink4Description=https://datasheet.octopart.com/MPZ1608S221ATD25-TDK-datasheet-59262048.pdf?src-supplier=Future+Electronics, ComponentLink4URL=https://datasheet.octopart.com/MPZ1608S221ATD25-TDK-datasheet-59262048.pdf?src-supplier=Future+Electronics, Core Material=228ConductorMaterial, ESR=50mR, Item Type="Ferrite Bead", Lead Free=5697LeadFree, Manufacturer Part Number=MPZ1608S221ATD25, Pricing="1=0.1, 10=0.052, 50=0.052, 100=0.04, 1000=0.03, 10000=0.02 (USD)", RoHS=Yes, Stock=63812, Supplier=Mouser
J1 J9 J10 J11 J12 J15 J16 J17 J18: "1x2P 18A -40℃~+105℃ 250V Green 12~30 Straight 5.08mm 2.5 1 2 Plugin,P=5.08mm Screw terminal ROHS", LCSC Part Number=C395868, Manufacturer=DORABO, Package=Plugin,P=5.08mm, ComponentLink1Description=LCSC, ComponentLink1URL=https://www.lcsc.com/product-detail/Screw-terminal_DORABO-DB128L-5-08-2P-GN-S_C395868.html, Item Type="Terminal Block", Manufacturer Part Number=DB128L-5.08-2P-GN-S
J2: "5A 1 16P Mother -25℃~+85℃ Type-C SMD USB Connectors ROHS", LCSC Part Number=C2938598, Manufacturer="XKB Connection", Package=SMD, ComponentLink1Description=LCSC, ComponentLink1URL=https://www.lcsc.com/product-detail/USB-Connectors_XKB-Connection-U263-163N-4BQC65_C2938598.html, Item Type="USB Connectors", Manufacturer Part Number=U263-163N-4BQC65
J3: library part C145963, "1x6P SH 1 1mm 6 SMD,P=1mm Wire To Board / Wire To Wire Connector ROHS", Manufacturer=BOOMELE, Package=SMD,P=1mm, ComponentLink1Description=LCSC, ComponentLink1URL=https://www.lcsc.com/product-detail/Wire-To-Board-Wire-To-Wire-Connector_BOOMELE-Boom-Precision-Elec-C145963_C145963.html, Item Type=Connector, LCSC Part Number=C145963, Manufacturer Part Number=C145963
J4: "2mm 2.54mm Plugin 2.5A -40℃~+105℃ Straight 1x4P Top 8.5mm 4 Square Hole Plugin,P=2.54mm Female Headers ROHS", LCSC Part Number=C5116530, Manufacturer=ZHOURI, Package=Plugin,P=2.54mm, ComponentLink1Description=LCSC, ComponentLink1URL=https://www.lcsc.com/product-detail/span-style-background-color-ff0-Female-span-Headers_ZHOURI-PM2-54-1-4_C5116530.html, Item Type="Female Header", Manufacturer Part Number=PM2.54-1*4
J5: "Battery base CR2032 SMD Battery Connectors ROHS", LCSC Part Number=C70377, Manufacturer=Q&J, ComponentLink1Description=LCSC, ComponentLink1URL=https://www.lcsc.com/product-detail/Battery-Connectors_Q-J-CR2032-BS-6-1_C70377.html, Item Type=Connector, Manufacturer Part Number=CR2032-BS-6-1
J6 J7: "-45℃~+105℃ Bend-in 3A Gold Copper 500V 2x3P 3 Simple cow constellation 2.54mm 2 Push-Pull,P=2.54mm IDC Connectors ROHS", LCSC Part Number=C19193818, Manufacturer="Lian Xin Technology", Package=Push-Pull,P=2.54mm, ComponentLink1Description=LCSC, ComponentLink1URL=https://www.lcsc.com/product-detail/IDC-Connectors_Lian-Xin-Technology-XDFH-0259-2-3P_C19193818.html, Item Type="IDC Connector", Manufacturer Part Number=XDFH-0259-2*3P
J8: "Battery box 18650 SMD Button And Strip Battery Connector ROHS", LCSC Part Number=C2988620, Manufacturer=MYOUNG, Package=SMD, ComponentLink1Description=LCSC, ComponentLink1URL=https://www.lcsc.com/product-detail/Battery-Connectors_MYOUNG-BH-18650-B1BA002_C2988620.html, Item Type="Battery Connector", Manufacturer Part Number=BH-18650-B1BA002
J13 J14 J22: "1x3P 18A -40℃~+105℃ 250V Green 12~30 Direct Insert 5.08mm 2.5 1 3 Plugin,P=5.08mm Screw Terminal Blocks ROHS", LCSC Part Number=C395869, Manufacturer=DORABO, Package=Plugin,P=5.08mm, ComponentLink1Description=LCSC, ComponentLink1URL=https://www.lcsc.com/product-detail/Screw-Terminal-Blocks_DORABO-DB128L-5-08-3P-GN-S_C395869.html, Item Type="Terminal Block", Manufacturer Part Number=DB128L-5.08-3P-GN-S
J19: "1x9P 20A -40℃~+105℃ 300V Green 12~30 Straight pin 5.08mm 2.5 1 9 Plugin,P=5.08mm Screw terminal ROHS", LCSC Part Number=C2938972, Manufacturer=DIBO, Package=Plugin,P=5.08mm, ComponentLink1Description=LCSC, ComponentLink1URL=https://www.lcsc.com/product-detail/Screw-terminal_DIBO-DB128V-5-08-9P-GN-S_C2938972.html, Item Type="Terminal Block", Manufacturer Part Number=DB128V-5.08-9P-GN-S
J20: "1x4P 18A -40℃~+105℃ 250V Green 12~30 Direct Insert 5.08mm 2.5 1 4 Plugin,P=5.08mm Screw Terminal Blocks ROHS", LCSC Part Number=C2827883, Manufacturer=DORABO, Package=Plugin,P=5.08mm, ComponentLink1Description=LCSC, ComponentLink1URL=https://www.lcsc.com/product-detail/Screw-Terminal-Blocks_DORABO-DB128L-5-08-4P-GN-S_C2827883.html, Item Type="Terminal Block", Manufacturer Part Number=DB128L-5.08-4P-GN-S
J21: "RJ45 RJReceptacle 1 有屏蔽 Right-Angle WithLED 0℃~+70℃ Plugin Ethernet Connectors/Modular Connectors (RJ45 RJ11) ROHS", LCSC Part Number=C386757, Manufacturer=Ckmtw, Package=Plugin, ComponentLink1Description=LCSC, ComponentLink1URL=https://www.lcsc.com/product-detail/Ethernet-Connectors-Modular-Connectors-span-style-background-color-ff0-RJ45-span-RJ11_Ckmtw-Shenzhen-Cankemeng-R-RJ45R08P-C000_C386757.html, Item Type="Connectors (RJ45 RJ11)", Manufacturer Part Number=R-RJ45R08P-C000
J23: "Gold 250V 3A Straight Square Pins 2.5mm 2P 260℃ 6mm -40℃~+105℃ 3mm 2.54mm Plugin Black Brass 1x2P Plugin,P=2.54mm Pin Headers ROHS", LCSC Part Number=C706874, Manufacturer=XKB, Package=Plugin,P=2.54mm, ComponentLink1Description=LCSC, ComponentLink1URL=https://www.lcsc.com/product-detail/Pin-Headers_XKB-Connectivity-X6511WV-02H-C60D30_C706874.html, Item Type="Male Header", Manufacturer Part Number=X6511WV-02H-C60D30
K1 K2 K3 K4: "RELAY GEN PURPOSE SPST 16A 5V", Case/Package=DIP, Coil Current=80mA, Coil Resistance=62.5R, Coil Voltage (DC)=5V, Contact Current Rating=16A, LCSC Part Number=C113250, Manufacturer=Omron, Max Operating Temperature=85°C, Max Voltage Rating (AC)=250V, Max Voltage Rating (DC)=24V, Min Operating Temperature=-40°C, Power Consumption=400mW, ComponentLink1Description=https://datasheet.ciiva.com/5233/g5rl-0911-9106-5233888.pdf?src-supplier=Mouser, ComponentLink1URL=https://datasheet.ciiva.com/5233/g5rl-0911-9106-5233888.pdf?src-supplier=Mouser, Contact Material=Silver,Cadmium, Height=15.7mm, Item Type="Power Relays", Lead Free="Lead Free", Manufacturer Part Number=G5RL-1A-E-HR-DC5, Max Current Rating=16A, Mounting Technology="Through Hole", Operate Time=15ms, Pins=6, Power Rating=400mW, Pricing="1=4.95, 10=4.327, 25=4.1008, 50=3.9372, 100=3.7801, 300=3.54387, 500=3.43916, 1000=3.30195 (USD)", RoHS=Yes, Stock=529, Supplier=Digikey, Termination="PC Pin", Throw Configuration=SPST, Weight=10g, Width=12.7mm
L1: library part YSPI1050-4R7M, "8A 4.7uH ±20% SMD,10x10.1mm Power Inductors ROHS", LCSC Part Number=C497895, Manufacturer=YJYCOIN, Package=SMD,10.1x10.1mm, ComponentLink1Description=LCSC, ComponentLink1URL=https://www.lcsc.com/product-detail/Power-Inductors_YJYCOIN-YSPI1050-4R7M_C497895.html, Item Type=Inductor, Manufacturer Part Number=YSPI1050-4R7M
L2: library part XFL4020-102MEC, "FIXED IND 1UH 11A 11.9MOHM SM", Case/Package=SMD/SMT, Inductance Tolerance=20%, LCSC Part Number=C5355380, Manufacturer=Coilcraft, Max DC Current=11A, Max Operating Temperature=125°C, Min Operating Temperature=-40°C, Saturation Current=4.5A, Self Resonant Frequency=64MHz, Supplier Part Number=994-XFL4020-102MEC, Test Frequency=100kHz, Category="Fixed Inductors", ComponentLink1Description=https://datasheet.ciiva.com/22679/1682010-22679273.pdf?src-supplier=Element14, ComponentLink1URL=https://datasheet.ciiva.com/22679/1682010-22679273.pdf?src-supplier=Element14, ComponentLink2Description=https://datasheet.ciiva.com/22679/1682010-22679274.pdf?src-supplier=Element14, ComponentLink2URL=https://datasheet.ciiva.com/22679/1682010-22679274.pdf?src-supplier=Element14, ComponentLink3Description=https://datasheet.ciiva.com/13168/xfl4020-13168079.pdf?src-supplier=Mouser, ComponentLink3URL=https://datasheet.ciiva.com/13168/xfl4020-13168079.pdf?src-supplier=Mouser, Core Material=Composite, ESR=11.9mR, Height=2.1mm, Item Type=Inductor, Lead Free="Contains Lead", Length=4.3mm, Manufacturer Part Number=XFL4020-102MEC, Mounting Technology="Surface Mount", Packaging="Tape and Reel", Pricing="1=2.68, 10=2.68, 50=2.68, 100=2.68, 1000=1.01, 10000=1.01 (USD)", Reach SVHC Compliant=No, RMS Current (Irms)=11A, RoHS=Yes, RoHS Compliant=Yes, Series=XFL4020, Shielding=Shielded, Stock=12821, Supplier=Mouser, Termination=SMD/SMT, Tolerance=20%, Width=4.3mm
L3: library part YSPI0520-2R2M, "4A 2.2uH ±20% 32mΩ SMD,5.4x5.2x2mm Power Inductors ROHS", LCSC Part Number=C718375, Manufacturer=YJYCOIN, ComponentLink1Description=LCSC, ComponentLink1URL=https://www.lcsc.com/product-detail/Power-Inductors_YJYCOIN-YSPI0520-2R2M_C718375.html, Item Type=Inductor, Manufacturer Part Number=YSPI0520-2R2M
L4: library part FCH1365-680M, "4.5A 68uH Molding Choke ±20% 5.5A SMD,13.7x12.8mm Power Inductors ROHS", LCSC Part Number=C20415558, Manufacturer=FANGCHENG, Package=SMD,13.7x12.8mm, ComponentLink1Description=LCSC, ComponentLink1URL=https://www.lcsc.com/product-detail/Power-Inductors_FANGCHENG-FCH1365-680M_C20415558.html, Item Type=Inductor, Manufacturer Part Number=FCH1365-680M
LED1 LED2 LED3 LED4 LED7: library part NCD0603R3, "RED LED 0603 Light Emitting Diodes", LCSC Part Number=C3151730, Manufacturer="Foshan NationStar Optoelectronics", Package=0603, ComponentLink1Description=LCSC, ComponentLink1URL=https://www.lcsc.com/product-detail/Light-Emitting-Diodes-LED_Foshan-NationStar-Optoelectronics-NCD0603R3_C3151730.html, Item Type=LED, Manufacturer Part Number=NCD0603R3
LED5: "SMD5050 Light Emitting Diodes (LED) ROHS", LCSC Part Number=C4154882, Manufacturer=Worldsemi, Package=SMD5050, ComponentLink1Description=LCSC, ComponentLink1URL=https://www.lcsc.com/product-detail/Light-Emitting-Diodes-LED_Worldsemi-WS2812B-XF02-W_C4154882.html, Item Type="RGB LED", Manufacturer Part Number=WS2812B-XF02/W
LED6 LED8 LED9 LED10 LED11 LED12: library part NCD0603G2, "Emerald 0603 Light Emitting Diodes (LED) ROHS", LCSC Part Number=C87326, Manufacturer="Foshan NationStar Optoelectronics", Package=0603, ComponentLink1Description=LCSC, ComponentLink1URL=https://www.lcsc.com/product-detail/Light-Emitting-Diodes-LED_Foshan-NationStar-Optoelectronics-NCD0603G2_C87326.html, Item Type=LED, Manufacturer Part Number=NCD0603G2
Q1: "MOSFET N-CH 60V 15A PWRDI3333", Continuous Drain Current (ID)=80A, Drain to Source Voltage (Vdss)=60V, Input Capacitance=2.09nF, LCSC Part Number=C2802568, Manufacturer=Diodes, Max Operating Temperature=150°C, Max Power Dissipation=2.2W, Min Operating Temperature=-55°C, ComponentLink1Description=http://www.mouser.com/ds/2/115/DMT6007LFG-792694.pdf?src-supplier=Mouser, ComponentLink1URL=http://www.mouser.com/ds/2/115/DMT6007LFG-792694.pdf?src-supplier=Mouser, ComponentLink2Description=https://www.diodes.com/assets/Datasheets/DMT6007LFG.pdf?src-supplier=Digikey, ComponentLink2URL=https://www.diodes.com/assets/Datasheets/DMT6007LFG.pdf?src-supplier=Digikey, Item Type=MOSFETs, Manufacturer Part Number=DMT6007LFG-7, Mounting Technology="Surface Mount", Packaging="Cut Tape", Pins=8, Pricing="1=1.33, 10=0.897, 100=0.628, 500=0.50734, 1000=0.46783 (USD)", Rds On Max=6mR, RoHS=Yes, RoHS Compliant=Yes, Series=-, Stock=22065, Supplier=Digikey
Q2: "40V 12A 11mΩ@10V,15A 6.3W 1.4V 1 piece P-channel TO-252 MOSFETs ROHS", LCSC Part Number=C18189874, Manufacturer=JSMSEMI, Package=TO-252, ComponentLink1Description=LCSC, ComponentLink1URL=https://www.lcsc.com/product-detail/MOSFETs_JSMSEMI-AOD4185-JSM_C18189874.html, Item Type=Mosfet, Manufacturer Part Number=AOD4185-JSM
Q3 Q5 Q6 Q7 Q8: "40V 100mW 100@10mA,1V 200mA 300MHz 300mV@50mA,5mA NPN -55℃~+150℃@(Tj) SOT-723 Bipolar Transistors - BJT ROHS", LCSC Part Number=C2923360, Manufacturer="TECH PUBLIC", Package=SOT-723, ComponentLink1Description=LCSC, ComponentLink1URL=https://www.lcsc.com/product-detail/Bipolar-Transistors-BJT_TECH-PUBLIC-MMBT3904M_C2923360.html, Item Type=Mosfet, Manufacturer Part Number=MMBT3904M
Q4: "N-CHANNEL 20-V (D-S) MOSFET", LCSC Part Number=C5310968, Manufacturer="TECH PUBLIC", Manufacturer Part Number=SI2302CDS, Package=SOT-23, ComponentLink1Description=LCSC, ComponentLink1URL=https://www.lcsc.com/product-detail/MOSFETs_TECH-PUBLIC-SI2302CDS_C5310968.html, Item Type=Mosfet
R1: library part RT0603BRE07301KL, "RES SMD 301K OHM 0.1% 1/10W 0603", Case/Package=0603, LCSC Part Number=C326750, Manufacturer=Yageo, Max Operating Temperature=125°C, Max Power Dissipation=100mW, Min Operating Temperature=-55°C, Package Quantity=5000, Resistance=301kR, Resistor Type="Thin Film", Supplier Part Number 1=603-RT0603BRE07301KL, Temperature Coefficient=50ppm/°C, Tolerance=0.1%, Voltage Rating (DC)=50V, Category="Chip SMD Resistors", ComponentLink1Description=https://datasheet.ciiva.com/2584/pyu-rt-1-to-0-05-rohs-l-5-2584420.pdf?src-supplier=Digi-Key, ComponentLink1URL=https://datasheet.ciiva.com/2584/pyu-rt-1-to-0-05-rohs-l-5-2584420.pdf?src-supplier=Digi-Key, Height=0.022inch, Item Type=Resistor, Lead Free="Lead Free", Length=0.063inch, Manufacturer Part Number=RT0603BRE07301KL, Number of Terminations=2, Packaging="Tape and Reel", Pricing 1="1=0.42000, 10=0.30200, 50=0.30200, 100=0.12100, 1000=0.06000, 10000=0.04900 (USD)", RoHS=Yes, RoHS Compliant=Yes, Series=RT, Stock 1=2800, Supplier 1=Mouser, Width=0.031inch
R2: library part FMF25FPJR012-LH, "2W 12mΩ Current Sensing Resistors ±50ppm/℃ ±1% 2512 Current Sense Resistors / Shunt Resistors ROHS", LCSC Part Number=C2847460, Manufacturer="PSA(Prosperity Dielectrics)", Package=2512, ComponentLink1Description=LCSC, ComponentLink1URL=https://www.lcsc.com/product-detail/Current-Sense-Resistors-Shunt-Resistors_PSA-Prosperity-Dielectrics-FMF25FPJR012-LH_C2847460.html, Item Type=Resistor, Manufacturer Part Number=FMF25FPJR012-LH
R3 R24 R25: library part RT0402BRD07100KL, "RES SMD 100K OHM 0.1% 1/16W 0402", LCSC Part Number=C852472, Manufacturer=Yageo, Supplier Part Number=YAG1343CT-ND, Voltage Rating (DC)=50V, Category="Chip SMD Resistors", ComponentLink1Description=https://datasheet.ciiva.com/12724/pyu-rt-1-to-0-05-rohs-l-4-12724954.pdf?src-supplier=Mouser, ComponentLink1URL=https://datasheet.ciiva.com/12724/pyu-rt-1-to-0-05-rohs-l-4-12724954.pdf?src-supplier=Mouser, Item Type=Resistor, Manufacturer Part Number=RT0402BRD07100KL, Pricing="1=0.16, 10=0.121, 50=0.0958, 100=0.0859, 500=0.0654, 1000=0.0578, 5000=0.04283 (USD)", RoHS=Yes, Stock=62932, Supplier=Digikey
R4 R20: library part RT0603BRD07100KL, "RES SMD 100K OHM 0.1% 1/10W 0603", Case Code (Imperial)=0603, Case Code (Metric)=1608, LCSC Part Number=C122538, Manufacturer=Yageo, Max Operating Temperature=125°C, Max Power Dissipation=100mW, Min Operating Temperature=-55°C, Package Quantity=5000, Resistance=100kR, Supplier Part Number 1=YAG1235CT-ND, Temperature Coefficient=25ppm/°C, Tolerance=0.1%, Voltage Rating=75V, Case/Package=0603, ComponentLink1Description=http://documents.rs-components.com/techlib://itc_doclist_GB.htm?stockno=6174810&src-supplier=RSComponents, ComponentLink1URL=http://documents.rs-components.com/techlib://itc_doclist_GB.htm?stockno=6174810&src-supplier=RSComponents, Composition="Thin Film", Depth=0.8mm, Features="Moisture Resistant", Height=0.022inch, Item Type=Resistor, Lead Free="Lead Free", Length=1.6mm, Manufacturer Part Number=RT0603BRD07100KL, Military Standard=Not, Mount="Surface Mount", Number of Terminations=2, Packaging="Tape and Reel", Power Rating=100mW, Pricing 1="1=0.39, 10=0.332, 100=0.1298, 1000=0.05435, 2500=0.04982 (USD)", Stock 1=53395, Supplier 1=Digi-Key, Termination=SMD/SMT, Voltage Rating (DC)=75V, Width=0.031inch, Working Voltage=75V
R5: library part RC0402FR-0731K6L, "RES 31.6K OHM 1% 1/16W 0402", Case Code (Imperial)=0402, Case Code (Metric)=1005, LCSC Part Number=C276265, Manufacturer=Yageo, Max Operating Temperature=155°C, Max Power Dissipation=63mW, Min Operating Temperature=-55°C, Package Quantity=10000, Power Rating=62.5mW, Temperature Coefficient=100ppm/°C, Tolerance=1%, Voltage Rating=50V, Case/Package=0402, Construction=Rectangular, Depth=0.5mm, Features="Moisture Resistant", Height=0.016inch, Item Type=Resistors, Lead Free=5697LeadFree, Length=1mm, Manufacturer Part Number=RC0402FR-0731K6L, Military Standard=Not, Number of Terminations=2, Packaging="Tape and Reel", Pricing="10000=0.0004, 50000=0.0007, 100000=0.0004, 200000=0.0007, 300000=0.0004, 500000=0.0007, 750000=0.0004, 1250000=0.0006, 2000000=0.0004 (USD)", RoHS=Yes, RoHS Compliant=Yes, Series=RC, Stock=90000, Supplier="Future Electronics", Termination=SMD/SMT, Voltage Rating (DC)=50V, Weight=10.729601oz, Width=0.5mm